# Allegro board SUB_DISPLAY_BOARD_V1_0.brd
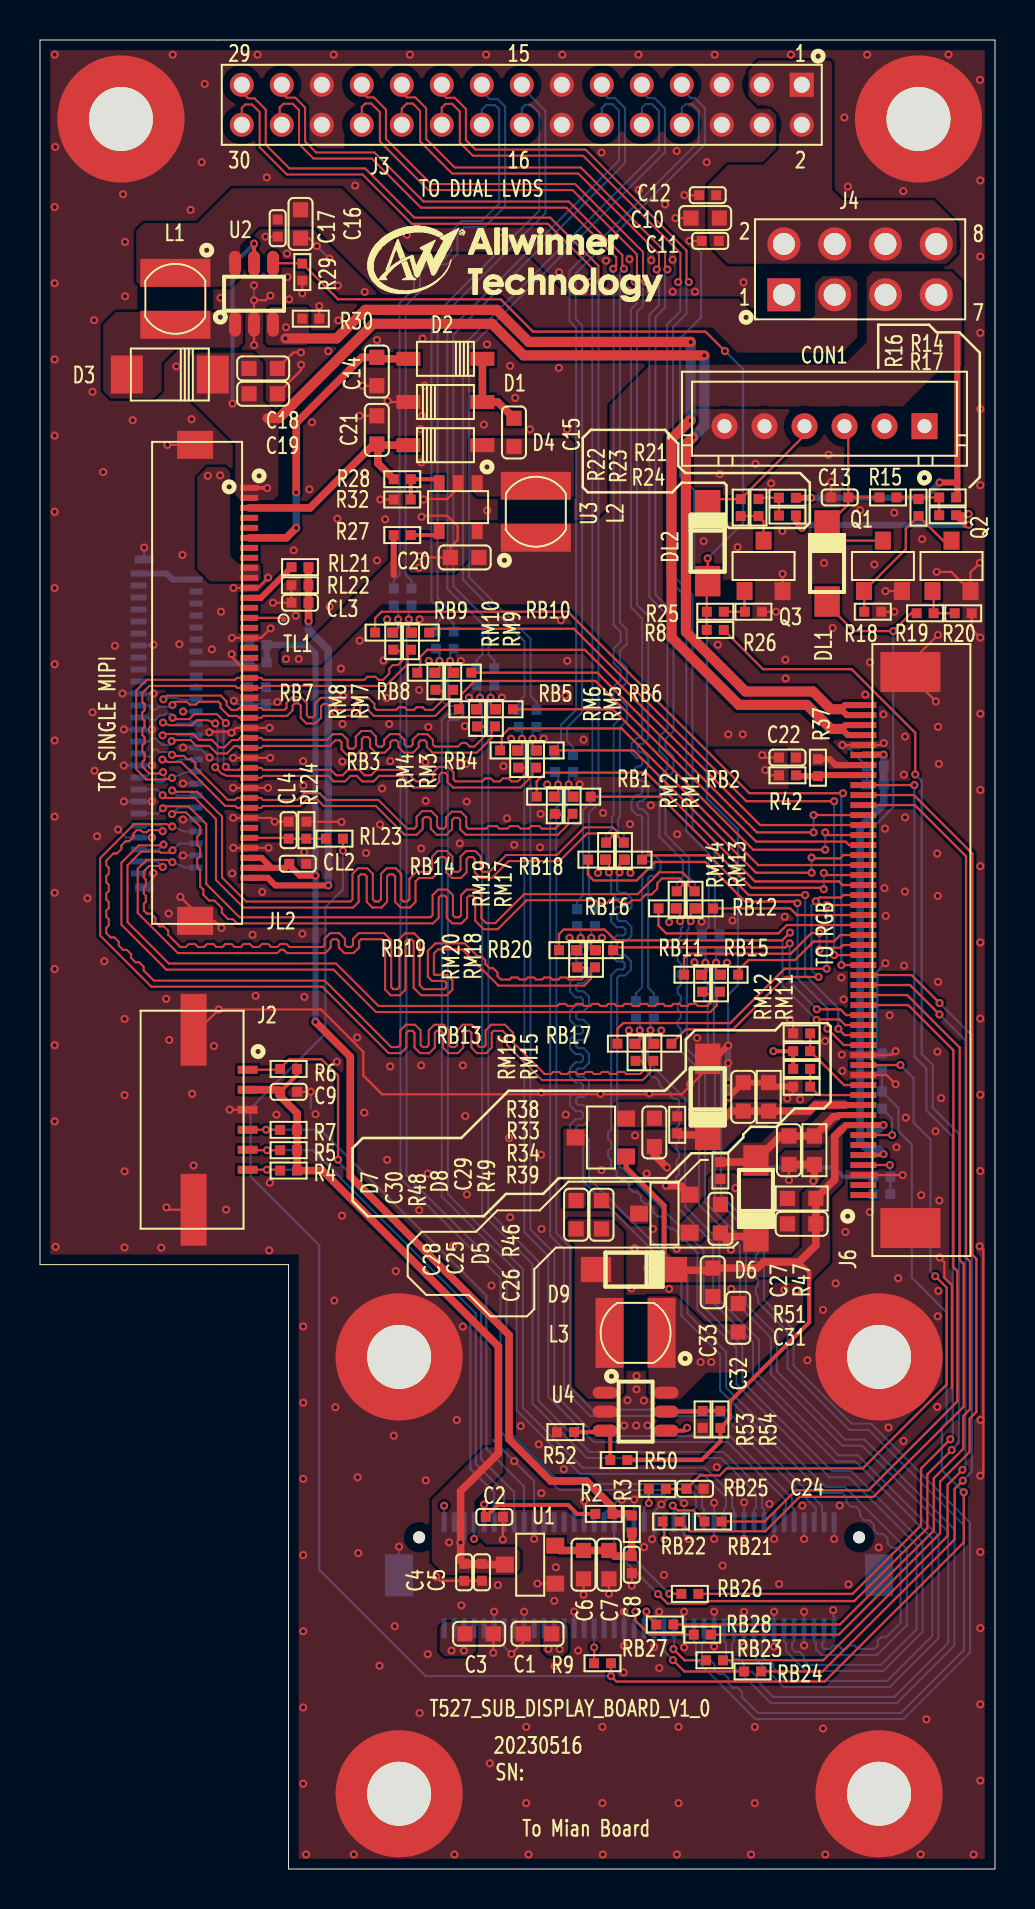
[diagram p0: board, top side]
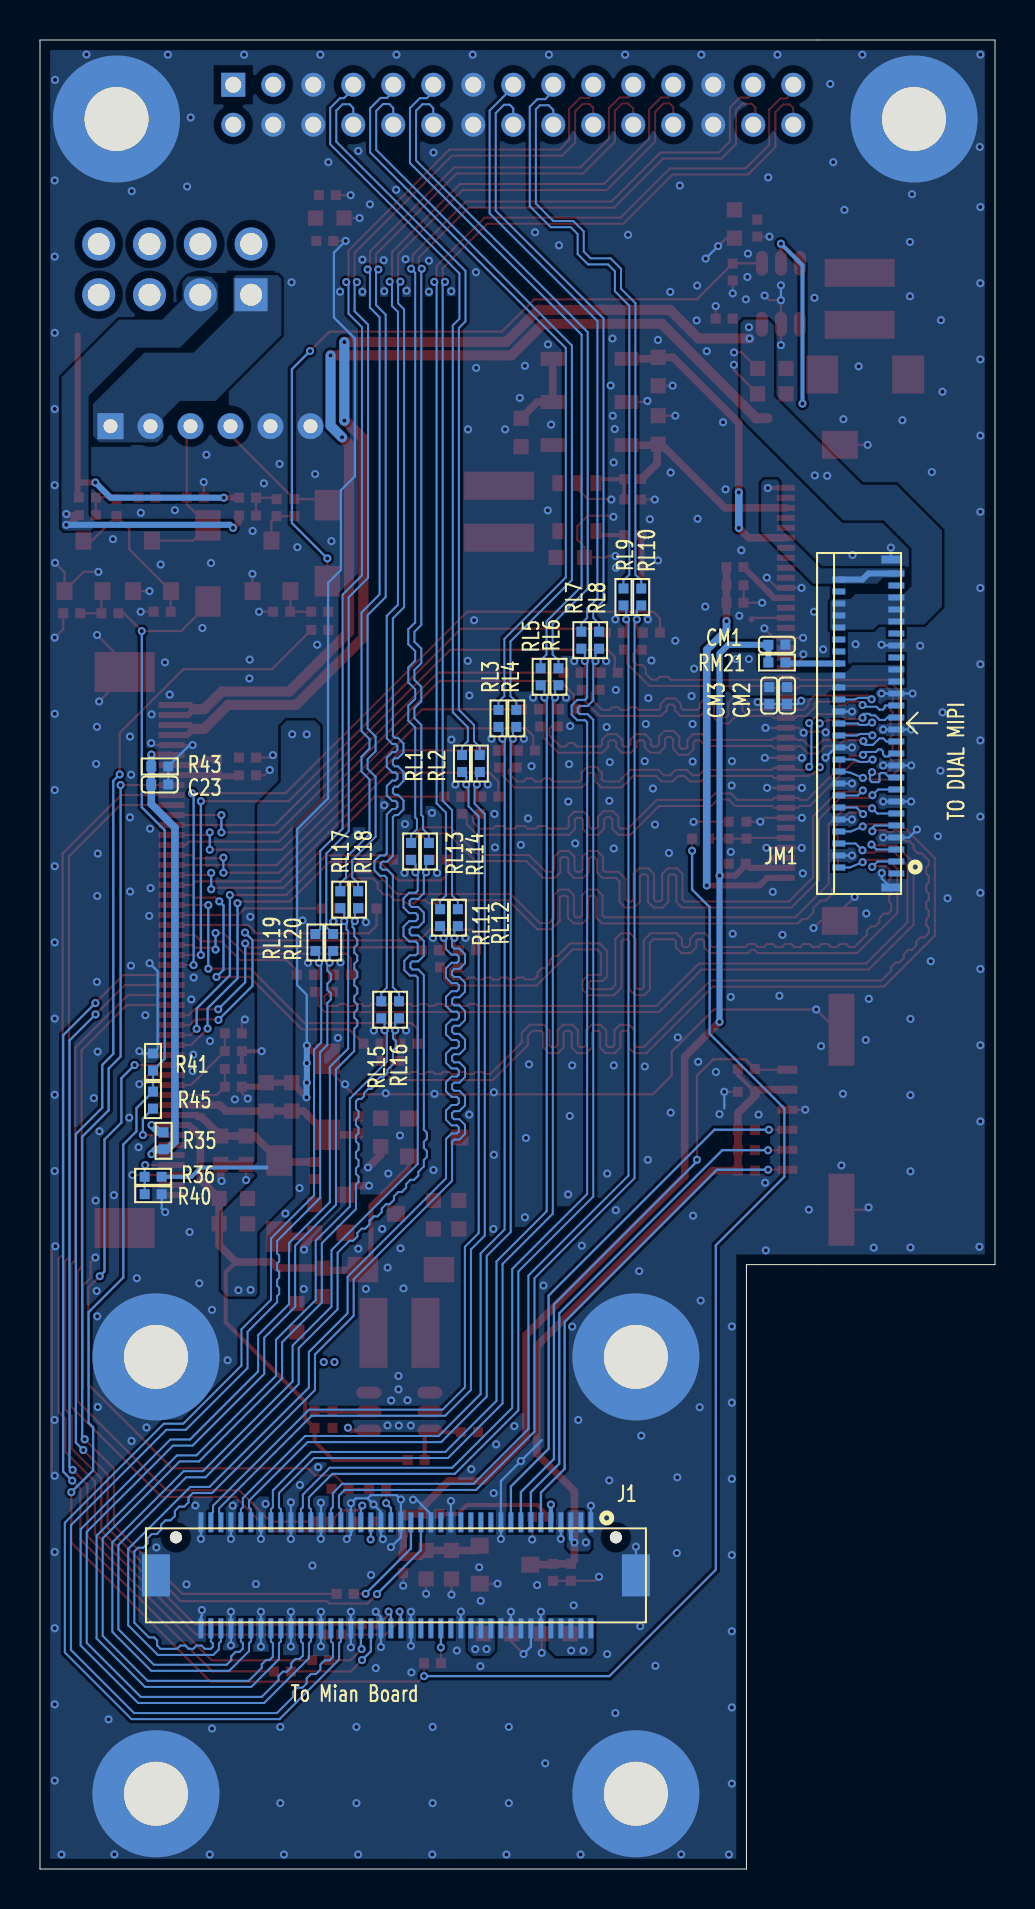
[diagram p1: board, bottom side, seen from below]

Outline 47.75 x 91.45 mm; copper layers: TOP, L2, L3, BOTTOM. Coordinates in mm from the lower left corner of the outline.
Outline path: 0,91.45 47.75,91.45 47.75,0 12.43,0 12.43,30.22 0,30.22 0,91.45

## Design rules (mm)
net group LCD-CLK: nets LCD0-CLK LCD-CLK
net group LCD-D20: nets LCD0-D20 LCD-D20
net group LCD-D21: nets LCD0-D21 LCD-D21
net group LCD-D22: nets LCD0-D22 LCD-D22
net group LCD-D23: nets LCD0-D23 LCD-D23
net group LCD-DE: nets LCD0-DE LCD-DE
net group LCD-HSYNC: nets LCD0-HSYNC LCD-HSYNC
net group LCD-VSYNC: nets LCD0-VSYNC LCD-VSYNC
net group DSI0-CKN: nets DSI0-CKN DSI0-CLKN LVDS0-DN2
net group DSI0-CKP: nets DSI0-CKP DSI0-CLKP LVDS0-DP2
net group DSI0-D0N: nets DSI0-D0N DSI0-DN0 LVDS0-DN0
net group DSI0-D0P: nets DSI0-D0P DSI0-DP0 LVDS0-DP0
net group DSI0-D1N: nets DSI0-D1N DSI0-DN1 LVDS0-DN1
net group DSI0-D1P: nets DSI0-D1P DSI0-DP1 LVDS0-DP1
net group DSI0-D2N: nets DSI0-D2N DSI0-DN2 LVDS0-CLKN
net group DSI0-D2P: nets DSI0-D2P DSI0-DP2 LVDS0-CLKP
net group DSI0-D3N: nets DSI0-D3N DSI0-DN3 LVDS0-DN3
net group DSI0-D3P: nets DSI0-D3P DSI0-DP3 LVDS0-DP3
net group DSI1-CKN: nets DSI1-CKN DSI1-CLKN LVDS1-DN2
net group DSI1-CKP: nets DSI1-CKP DSI1-CLKP LVDS1-DP2
net group DSI1-D0N: nets DSI1-D0N DSI1-DN0 LVDS1-DN0
net group DSI1-D0P: nets DSI1-D0P DSI1-DP0 LVDS1-DP0
net group DSI1-D1N: nets DSI1-D1N DSI1-DN1 LVDS1-DN1
net group DSI1-D1P: nets DSI1-D1P DSI1-DP1 LVDS1-DP1
net group DSI1-D2N: nets DSI1-D2N DSI1-DN2 LVDS1-CLKN
net group DSI1-D2P: nets DSI1-D2P DSI1-DP2 LVDS1-CLKP
net group DSI1-D3N: nets DSI1-D3N DSI1-DN3 LVDS1-DN3
net group DSI1-D3P: nets DSI1-D3P DSI1-DP3 LVDS1-DP3
net group LCD: nets LCD0-D0 LCD0-D1 LCD0-D2 LCD0-D3 LCD0-D4 LCD0-D5 LCD0-D6 LCD0-D7 LCD0-D8 LCD0-D9 LCD0-D10 LCD0-D11 LCD0-D12 LCD0-D13 LCD0-D14 LCD0-D15 LCD0-D16 LCD0-D17 LCD0-D18 LCD0-D19 LCD-BL-PWM LCD-BL-PWREN LCD-PWM LCD-PWREN LCD-RST
net group POWER: nets AVDD AVEE VCC-1V8 VCCIO-LCD1 VCL VCOM VCOM1

## Placement (name value [footprint] x y rotation side)
C1  22uF-10V  [C0603]  24.88 11.76 180 top
C2  100nF  [C0402]  22.72 17.6 0 top
C3  22uF-25V  [C0603]  21.96 11.76 0 top
C4  NC/10uF  [C0402]  21.21 14.84 90 top
C5  NC/100nF  [C0402]  22.1 14.84 90 top
C6  NC/22uF  [C0603]  27.18 15.22 90 top
C7  NC/22uF  [C0603]  28.45 15.22 90 top
C8  NC/100nF  [C0402]  29.59 15.22 90 top
C9  4.7uF  [C0402]  12.43 38.86 0 top
C10  10uF-25V  [C0603]  33.26 82.55 180 top
C11  100nF-50V  [C0402]  33.51 81.41 180 top
C12  100nF-50V  [C0402]  33.39 83.69 0 top
C13  1uF-16V  [C0402]  39.99 68.58 180 top
C14  10uF-10V  [C0603]  16.84 74.88 270 top
C15  10uF-10V  [C0603]  23.7 71.83 90 top
C16  10uF-10V  [C0603]  13.03 82.26 90 top
C17  1nF  [C0402]  11.88 82.04 90 top
C18  10uF-50V  [C0603]  11.16 75.03 180 top
C19  220nF-50V  [C0603]  11.16 73.76 180 top
C20  10uF  [C0603]  21.24 65.58 180 top
C21  10uF-10V  [C0603]  16.84 71.96 90 top
C22  10uF  [C0402]  37.37 55.58 0 top
C23  2.2uF  [C0402]  41.76 54.23 0 bottom
C24  NC  [C0402]  32.75 19.01 180 top
C25  220nF-50V  [C0603]  28.08 32.72 270 top
C26  220nF-50V  [C0603]  34.02 32.51 90 top
C27  220nF-50V  [C0603]  37.45 35.94 90 top
C28  220nF-50V  [C0603]  26.81 32.72 270 top
C29  220nF--50V  [C0603]  35.16 38.61 270 top
C30  220nF-50V  [C0603]  30.72 36.83 90 top
C31  220nF-50V  [C0603]  38.08 32.26 0 top
C32  10uF  [C0603]  34.91 27.56 270 top
C33  10uF-50V  [C0603]  33.64 29.34 90 top
CL2  10uF  [C0402]  12.89 50.26 0 top
CL3  1uF  [C0402]  13 63.31 180 top
CL4  NC/1uF  [C0402]  12.43 51.94 90 top
CM1  1uF  [C0402]  10.91 61.21 180 bottom
CM2  10uF  [C0402]  10.4 58.67 270 bottom
CM3  100nF  [C0402]  11.29 58.67 270 bottom
CON1  CON1X6-2.0-F-DIP  [SKT1_6P200B460_1400H610_V]  39.23 72.14 180 top
D1  XBS104S14  [SOD155_270H118]  20.27 73.35 180 top
D2  XBS104S14  [SOD155_270H118]  20.27 75.51 0 top
D3  SS16F  [SOD250_380H100]  6.49 74.73 0 top
D4  XBS104S14  [SOD155_270H118]  20.27 71.19 180 top
D5  BAT54S  [SOT-23]  31.23 32.77 180 top
D6  6.8V  [SOD170_285H135]  35.8 33.53 90 top
D7  BAT54S  [SOT-23]  28.05 36.58 180 top
D8  18V  [SOD170_285H135]  33.39 38.61 90 top
D9  XBS104S14  [SOD170_285H135]  29.7 29.97 180 top
DL1  NC/XBS104S14  [SOD170_285H135]  39.35 65.28 270 top
DL2  NC/XBS104S14  [SOD170_285H135]  33.39 66.29 270 top
H1  NC-HOLE  [MTH635D320]  17.96 25.61 0 top
H2  NC-HOLE  [MTH635D320]  41.96 3.76 0 top
H3  NC-HOLE  [MTH635D320]  43.93 87.5 0 top
H4  NC-HOLE  [MTH635D320]  4.05 87.5 0 top
H5  NC-HOLE  [MTH635D320]  41.96 25.61 0 top
H6  NC-HOLE  [MTH635D320]  17.96 3.76 0 top
J1  DF17(2.0)-80DP-0.5V  [SKT2_40P50B570_2500H350]  29.96 14.68 0 bottom
J2  CTP_CN  [FPC8P100B515_1090H340_B]  7.6 37.47 270 top
J3  DC3-2.0MM-30P  [HDR2_15P200B400_3000H200]  24.09 88.21 270 top
J4  CON2X4-2.54-M  [HDR2_4P254B500_1016H1160]  41.01 79.98 90 top
J6  CON50  [FPC52P50B490_3060H200_T]  44.07 45.95 90 top
JL2  FPC-40P-0.5MM-B  [FPC42P50B450_2410H150]  7.86 59.31 270 top
JM1  FH35C-51S-0.3SHW  [FPC51P30B335_1690H90_T]  6.37 57.28 90 bottom
L1  10uH  [LP300_350H210]  6.77 78.51 270 top
L2  10uH-0.9A-DCR<0.02R  [LP300_350H210]  24.79 67.87 90 top
L3  4.7uH  [LP300_350H210]  29.78 26.81 180 top
NOREF  -  []  12.43 0 90 top
NOREF#2  -  []  -131.29 -43.51 0 top
NOREF#3  -  []  0 90.72 0 top
NOREF#4  -  []  49.15 27.9 0 top
Q1  2N3904  [SOT-23]  42.15 65.15 90 top
Q2  2N3904  [SOT-23]  45.58 65.15 90 top
Q3  2N3904  [SOT-23]  36.18 65.15 90 top
R2  0R  [R0402]  28.19 17.76 0 top
R3  NC/0R  [R0402]  29.59 17.25 90 top
R4  NC/4K7  [R0402]  12.43 34.92 0 top
R5  NC/4K7  [R0402]  12.43 35.94 0 top
R6  NC/4K7  [R0402]  12.43 40.01 0 top
R7  NC/4K7  [R0402]  12.43 36.96 0 top
R8  0R  [R0402]  33.76 61.96 0 top
R9  0R  [R0402]  28.13 10.29 180 top
R14  NC/0R  [R0402]  45.38 68.58 0 top
R15  10K  [R0402]  42.4 68.58 0 top
R16  10K  [R0402]  43.93 68.07 90 top
R17  0R  [R0402]  45.38 67.69 0 top
R18  4.7K  [R0402]  41.64 62.87 180 top
R19  1K  [R0402]  44.26 62.79 180 top
R20  10K  [R0402]  46.16 62.79 180 top
R21  NC/0R  [R0402]  37.37 68.56 0 top
R22  1K  [R0402]  35.04 68.07 270 top
R23  1K  [R0402]  35.93 68.07 90 top
R24  0R  [R0402]  37.37 67.68 0 top
R25  1K  [R0402]  33.77 62.87 180 top
R26  10K  [R0402]  35.67 62.87 180 top
R27  10K  [R0402]  18.11 66.7 0 top
R28  9.1K-1%  [R0402]  18.11 69.49 0 top
R29  47K  [R0402]  13.12 79.85 90 top
R30  3R3-1%  [R0402]  13.54 77.52 180 top
R32  2.4K-1%  [R0402]  18.11 68.48 180 top
R33  NC/10K  [R0402]  38.08 40.89 0 top
R34  NC/10K  [R0402]  38.08 40.01 0 top
R35  3K-1%  [R0402]  41.57 36.41 270 bottom
R36  NC/10K  [R0402]  42.1 34.61 0 bottom
R37  10K  [R0402]  38.9 55.07 270 top
R38  10K  [R0402]  38.08 41.78 180 top
R39  10K  [R0402]  38.08 39.12 180 top
R40  10K  [R0402]  42.09 33.74 180 bottom
R41  1M  [R0402]  42.1 40.36 90 bottom
R42  NC/10K  [R0402]  37.37 54.69 180 top
R43  2.2K-1%  [R0402]  41.76 55.13 180 bottom
R45  10R  [R0402]  42.1 38.45 270 bottom
R46  1K5  [R0402]  34.02 34.92 90 top
R47  47K  [R0603]  38.72 35.94 270 top
R48  1K5  [R0402]  31.86 37.21 90 top
R49  47K  [R0603]  36.43 38.61 270 top
R50  71.5K-1%  [R0402]  28.94 20.45 0 top
R51  47K  [R0603]  38.08 33.53 0 top
R52  1.5K-1%  [R0402]  26.27 21.84 0 top
R53  NC  [R0402]  33.13 22.48 90 top
R54  0R  [R0402]  34.02 22.48 90 top
RB1  0R  [R0402]  25.26 53.62 0 top
RB2  0R  [R0402]  27.11 53.62 180 top
RB3  0R  [R0402]  23.43 55.93 0 top
RB4  0R  [R0402]  25.28 55.93 180 top
RB5  0R  [R0402]  21.37 57.99 0 top
RB6  0R  [R0402]  23.23 57.99 180 top
RB7  0R  [R0402]  19.29 59.82 0 top
RB8  0R  [R0402]  21.14 59.82 180 top
RB9  0R  [R0402]  17.18 61.82 0 top
RB10  0R  [R0402]  19.03 61.82 180 top
RB11  0R  [R0402]  32.63 44.72 0 top
RB12  0R  [R0402]  33.23 48.03 180 top
RB13  0R  [R0402]  29.3 41.27 0 top
RB14  0R  [R0402]  27.82 50.47 0 top
RB15  0R  [R0402]  34.48 44.72 180 top
RB16  0R  [R0402]  31.35 48.03 0 top
RB17  0R  [R0402]  31.15 41.27 180 top
RB18  0R  [R0402]  29.68 50.47 180 top
RB19  0R  [R0402]  26.37 45.94 0 top
RB20  0R  [R0402]  28.23 45.94 180 top
RB21  0R  [R0402]  33.65 17.37 180 top
RB22  0R  [R0402]  31.56 17.37 180 top
RB23  0R  [R0402]  33.72 10.44 180 top
RB24  0R  [R0402]  35.63 9.88 180 top
RB25  33R  [R0402]  30.87 19.01 180 top
RB26  0R  [R0402]  32.49 13.76 180 top
RB27  0R  [R0402]  31.24 12.23 180 top
RB28  0R  [R0402]  33.11 11.72 180 top
RL1  0R  [R0402]  26.65 55.28 270 bottom
RL2  0R  [R0402]  25.76 55.28 270 bottom
RL3  0R  [R0402]  24.83 57.53 270 bottom
RL4  0R  [R0402]  23.94 57.53 270 bottom
RL5  0R  [R0402]  22.72 59.61 270 bottom
RL6  0R  [R0402]  21.83 59.61 270 bottom
RL7  0R  [R0402]  20.69 61.44 270 bottom
RL8  0R  [R0402]  19.8 61.44 270 bottom
RL9  0R  [R0402]  18.58 63.6 270 bottom
RL10  0R  [R0402]  17.69 63.6 270 bottom
RL11  0R  [R0402]  27.75 47.57 270 bottom
RL12  0R  [R0402]  26.86 47.57 270 bottom
RL13  0R  [R0402]  29.19 50.88 270 bottom
RL14  0R  [R0402]  28.31 50.88 270 bottom
RL15  0R  [R0402]  30.69 42.96 270 bottom
RL16  0R  [R0402]  29.8 42.96 270 bottom
RL17  0R  [R0402]  32.74 48.47 270 bottom
RL18  0R  [R0402]  31.85 48.47 270 bottom
RL19  0R  [R0402]  33.98 46.33 270 bottom
RL20  0R  [R0402]  33.09 46.33 270 bottom
RL21  10K  [R0402]  13 65.1 0 top
RL22  10K  [R0402]  13 64.19 180 top
RL23  10K  [R0402]  14.72 51.52 180 top
RL24  12K  [R0402]  13.32 51.94 270 top
RM1  0R  [R0402]  26.63 53.19 90 top
RM2  0R  [R0402]  25.74 53.19 90 top
RM3  0R  [R0402]  24.8 55.5 90 top
RM4  0R  [R0402]  23.91 55.5 90 top
RM5  0R  [R0402]  22.74 57.56 90 top
RM6  0R  [R0402]  21.85 57.56 90 top
RM7  0R  [R0402]  20.66 59.39 90 top
RM8  0R  [R0402]  19.77 59.39 90 top
RM9  0R  [R0402]  18.55 61.39 90 top
RM10  0R  [R0402]  17.66 61.39 90 top
RM11  0R  [R0402]  34 44.28 90 top
RM12  0R  [R0402]  33.11 44.28 90 top
RM13  0R  [R0402]  32.72 48.46 270 top
RM14  0R  [R0402]  31.84 48.46 270 top
RM15  0R  [R0402]  30.67 40.84 90 top
RM16  0R  [R0402]  29.78 40.84 90 top
RM17  0R  [R0402]  29.19 50.9 270 top
RM18  0R  [R0402]  27.75 45.51 90 top
RM19  0R  [R0402]  28.31 50.9 270 top
RM20  0R  [R0402]  26.86 45.51 90 top
RM21  NC/0R  [R0402]  10.91 60.33 0 bottom
TL1  PWM  [TP30]  12.18 62.48 0 top
U1  NC/XC6206P182MR  [SOT-23]  24.51 15.22 180 top
U2  AP3032KTR-G1  [SOT23-6]  10.7 78.77 0 top
U3  SP4446  [SOT5P95B160_300H130]  20.91 68.09 270 top
U4  AP3031KTR-G1  [SOT23-6]  29.78 22.87 270 top

## Library data of the parts
C1-C3 C13 = CAPACITOR_0: room: LVDS
C4-C8 C22 CM1-CM3 = C-C0402
C9 = C-C0402: room: EMMC
C10 = C-C0603
C11 C12 = C-C0805
C14 C15 C20 C21 = C-C0603-X5R
C16-C19 C23 C24 C26-C33 = CAPACITOR_0
C25 = CAPACITOR_1
CL2-CL4 = C-C0402-X5R: room: EMMC
CON1 = CON1X6-2.54-F-DIP
D1 D2 D4 = DIO-XBS104S14
D3 D9 = DIODE SCHOTTKY
D5 D7 = DIODE_DUAL
D6 D8 = DIODE ZENER_0
DL1 DL2 = DIODE_SCHOTTKY_0
H1-H6 = HOLE
J1 = DF17-3.0-80DS-0.5V
J2 = CTP_CN_2
J3 = DC3-2_0.0MM-30P
J4 = CON2X4-2.54-M
J6 = AT070TN93_0
JL2 = FPC-40P-0_0.5MM-B
JM1 = FH35C-51S-0_0.3SHW
L1 L3 = INDUCTOR
L2 = L-L2520
Q1-Q3 = NPN-MMBT3904_0
R2 R3 R27 RL21 RL22 = R-R0603-5%
R4-R7 RM21 = R-R0402-5%
R8 R9 R14-R26 RB1-RB20 = R-R0603
R28 R32 RL23 RL24 = R-R0402-5%: room: EMMC
R29 R30 R33-R43 R45-R54 = RESISTOR
RB21-RB24 RB26-RB28 RL1-RL20 RM1-RM20 = R-R0603: signal model: R-R0603_R0402_0R_0R
RB25 = R-R0603: signal model: R-R0603_R0402_33R_33R
TL1 = TestPoint-on wire
U1 = TPS7B6933QDCYRQ1_0
U2 = AP3031: Tolerance: RichardLC
U3 = SP4446
U4 = AP3019: Tolerance: RichardLC

## Footprints (pads in the part's own frame, mm; a bottom-side part is the same pattern mirrored in y, then rotated)
C0402
  rect 0.5x0.5 smd: 1(-0.425,0) 2(0.425,0)
C0603
  rect 0.76x0.76 smd: 1(-0.71,0) 2(0.71,0)
FPC8P100B515_1090H340_B
  rect 0.4x1 smd: 1(-2.5,2.775) 2(-1.5,2.775) 3(-0.5,2.775) 4(0.5,2.775) 5(1.5,2.775) 6(2.5,2.775)
  rect 3.6x1.3 smd: 7(4.5,0.075) 8(-4.5,0.075)
FPC42P50B450_2410H150
  rect 0.3x0.9 smd: 1(-9.75,2.6) 2(-9.25,2.6) 3(-8.75,2.6) 4(-8.25,2.6) 5(-7.75,2.6) 6(-7.25,2.6) 7(-6.75,2.6) 8(-6.25,2.6) 9(-5.75,2.6) 10(-5.25,2.6) 11(-4.75,2.6) 12(-4.25,2.6) 13(-3.75,2.6) 14(-3.25,2.6) 15(-2.75,2.6) 16(-2.25,2.6) 17(-1.75,2.6) 18(-1.25,2.6) 19(-0.75,2.6) 20(-0.25,2.6) 21(0.25,2.6) 22(0.75,2.6) 23(1.25,2.6) 24(1.75,2.6) 25(2.25,2.6) 26(2.75,2.6) 27(3.25,2.6) 28(3.75,2.6) 29(4.25,2.6) 30(4.75,2.6) 31(5.25,2.6) 32(5.75,2.6) 33(6.25,2.6) 34(6.75,2.6) 35(7.25,2.6) 36(7.75,2.6) 37(8.25,2.6) 38(8.75,2.6) 39(9.25,2.6) 40(9.75,2.6)
  rect 1.4x1.8 smd: 41(11.9,-0.1) 42(-11.9,-0.1)
FPC51P30B335_1690H90_T
  rect 0.3x0.8 smd: 1(-7.5,-1.437) 3(-6.9,-1.437) 5(-6.3,-1.437) 7(-5.7,-1.437) 9(-5.1,-1.437) 11(-4.5,-1.437) 13(-3.9,-1.437) 15(-3.3,-1.437) 17(-2.7,-1.437) 19(-2.1,-1.437) 21(-1.5,-1.437) 23(-0.9,-1.437) 25(-0.3,-1.437) 27(0.3,-1.437) 29(0.9,-1.437) 31(1.5,-1.437) 33(2.1,-1.437) 35(2.7,-1.437) 37(3.3,-1.437) 39(3.9,-1.437) 41(4.5,-1.437) 43(5.1,-1.437) 45(5.7,-1.437) 47(6.3,-1.437) 49(6.9,-1.437) 51(7.5,-1.437)
  rect 0.3x0.65 smd: 2(-7.2,1.437) 4(-6.6,1.437) 6(-6,1.437) 8(-5.4,1.437) 10(-4.8,1.437) 12(-4.2,1.437) 14(-3.6,1.437) 16(-3,1.437) 18(-2.4,1.437) 20(-1.8,1.437) 22(-1.2,1.437) 24(-0.6,1.437) 26(0,1.437) 28(0.6,1.437) 30(1.2,1.437) 32(1.8,1.437) 34(2.4,1.437) 36(3,1.437) 38(3.6,1.437) 40(4.2,1.437) 42(4.8,1.437) 44(5.4,1.437) 46(6,1.437) 48(6.6,1.437) 50(7.2,1.437)
  rect 0.4x0.95 smd: 52(-8.2,-1.163) 53(8.2,-1.163)
FPC52P50B490_3060H200_T
  rect 0.3x1.3 smd: 1(-12.25,2.9) 2(-11.75,2.9) 3(-11.25,2.9) 4(-10.75,2.9) 5(-10.25,2.9) 6(-9.75,2.9) 7(-9.25,2.9) 8(-8.75,2.9) 9(-8.25,2.9) 10(-7.75,2.9) 11(-7.25,2.9) 12(-6.75,2.9) 13(-6.25,2.9) 14(-5.75,2.9) 15(-5.25,2.9) 16(-4.75,2.9) 17(-4.25,2.9) 18(-3.75,2.9) 19(-3.25,2.9) 20(-2.75,2.9) 21(-2.25,2.9) 22(-1.75,2.9) 23(-1.25,2.9) 24(-0.75,2.9) 25(-0.25,2.9) 26(0.25,2.9) 27(0.75,2.9) 28(1.25,2.9) 29(1.75,2.9) 30(2.25,2.9) 31(2.75,2.9) 32(3.25,2.9) 33(3.75,2.9) 34(4.25,2.9) 35(4.75,2.9) 36(5.25,2.9) 37(5.75,2.9) 38(6.25,2.9) 39(6.75,2.9) 40(7.25,2.9) 41(7.75,2.9) 42(8.25,2.9) 43(8.75,2.9) 44(9.25,2.9) 45(9.75,2.9) 46(10.25,2.9) 47(10.75,2.9) 48(11.25,2.9) 49(11.75,2.9) 50(12.25,2.9)
  rect 2x3 smd: 51(13.9,0.55) 52(-13.9,0.55)
HDR2_4P254B500_1016H1160
  rect 1.65x1.65 hole 1.1: 1(-1.27,3.81)
  round 1.65 hole 1.1: 2(1.27,3.81) 3(-1.27,1.27) 4(1.27,1.27) 5(-1.27,-1.27) 6(1.27,-1.27) 7(-1.27,-3.81) 8(1.27,-3.81)
HDR2_15P200B400_3000H200
  rect 1.2x1.2 hole 0.8: 1(-1,14)
  round 1.2 hole 0.8: 2(1,14) 3(-1,12) 4(1,12) 5(-1,10) 6(1,10) 7(-1,8) 8(1,8) 9(-1,6) 10(1,6) 11(-1,4) 12(1,4) 13(-1,2) 14(1,2) 15(-1,0) 16(1,0) 17(-1,-2) 18(1,-2) 19(-1,-4) 20(1,-4) 21(-1,-6) 22(1,-6) 23(-1,-8) 24(1,-8) 25(-1,-10) 26(1,-10) 27(-1,-12) 28(1,-12) 29(-1,-14) 30(1,-14)
LP300_350H210
  rect 1.4x3.5 smd: 1(-1.3,0) 2(1.3,0)
MTH635D320
  round 6.35 hole 3.2: 1(0,0)
R0402
  rect 0.5x0.5 smd: 1(-0.425,0) 2(0.425,0)
R0603
  rect 0.76x0.76 smd: 1(-0.71,0) 2(0.71,0)
SKT1_6P200B460_1400H610_V
  rect 1.3x1.3 hole 0.7: 1(-5,0)
  round 1.3 hole 0.7: 2(-3,0) 3(-1,0) 4(1,0) 5(3,0) 6(5,0)
SKT2_40P50B570_2500H350
  round 0.6 hole 0.6 unplated: (-11,-1.9) (11,-1.9)
  rect 0.25x1 smd: 1(-9.75,-2.65) 2(-9.75,2.65) 3(-9.25,-2.65) 4(-9.25,2.65) 5(-8.75,-2.65) 6(-8.75,2.65) 7(-8.25,-2.65) 8(-8.25,2.65) 9(-7.75,-2.65) 10(-7.75,2.65) 11(-7.25,-2.65) 12(-7.25,2.65) 13(-6.75,-2.65) 14(-6.75,2.65) 15(-6.25,-2.65) 16(-6.25,2.65) 17(-5.75,-2.65) 18(-5.75,2.65) 19(-5.25,-2.65) 20(-5.25,2.65) 21(-4.75,-2.65) 22(-4.75,2.65) 23(-4.25,-2.65) 24(-4.25,2.65) 25(-3.75,-2.65) 26(-3.75,2.65) 27(-3.25,-2.65) 28(-3.25,2.65) 29(-2.75,-2.65) 30(-2.75,2.65) 31(-2.25,-2.65) 32(-2.25,2.65) 33(-1.75,-2.65) 34(-1.75,2.65) 35(-1.25,-2.65) 36(-1.25,2.65) 37(-0.75,-2.65) 38(-0.75,2.65) 39(-0.25,-2.65) 40(-0.25,2.65) 41(0.25,-2.65) 42(0.25,2.65) 43(0.75,-2.65) 44(0.75,2.65) 45(1.25,-2.65) 46(1.25,2.65) 47(1.75,-2.65) 48(1.75,2.65) 49(2.25,-2.65) 50(2.25,2.65) 51(2.75,-2.65) 52(2.75,2.65) 53(3.25,-2.65) 54(3.25,2.65) 55(3.75,-2.65) 56(3.75,2.65) 57(4.25,-2.65) 58(4.25,2.65) 59(4.75,-2.65) 60(4.75,2.65) 61(5.25,-2.65) 62(5.25,2.65) 63(5.75,-2.65) 64(5.75,2.65) 65(6.25,-2.65) 66(6.25,2.65) 67(6.75,-2.65) 68(6.75,2.65) 69(7.25,-2.65) 70(7.25,2.65) 71(7.75,-2.65) 72(7.75,2.65) 73(8.25,-2.65) 74(8.25,2.65) 75(8.75,-2.65) 76(8.75,2.65) 77(9.25,-2.65) 78(9.25,2.65) 79(9.75,-2.65) 80(9.75,2.65)
  rect 1.4x2.1 smd: 81(12,0) 82(-12,0)
SOD155_270H118
  rect 1.2x0.7 smd: 1(-1.85,0) 2(1.85,0)
SOD170_285H135
  rect 1.524x1.27 smd: 1(1.9,0) 2(-1.9,0)
SOD250_380H100
  rect 1.6x1.9 smd: 1(-2.15,0) 2(2.15,0)
SOT5P95B160_300H130
  rect 0.8x0.55 smd: 1(-1.2,0.95) 2(-1.2,0) 3(-1.2,-0.95) 4(1.2,-0.95) 5(1.2,0.95)
SOT23-6
  oval 0.6x1.25 smd: 1(-0.95,-1.525) 2(0,-1.525) 3(0.95,-1.525) 4(0.95,1.525) 5(0,1.525) 6(-0.95,1.525)
SOT-23
  rect 0.9x0.8 smd: 1(-1.254,0.95) 2(-1.254,-0.95) 3(1.27,0)
TP30
  round 0.3 smd: 1(0,0)

## Nets
AVDD: C21.1 D4.2 JL2.3(VLED0) R28.1
AVDD-LCD: C31.2 C33.2 D7.1 D9.2 J6.8(AVDD) R35.1 R50.2 R51.2 R54.1
AVEE: C14.1 D2.1 JL2.6(NC12)
GND: C1.2 C2.2 C3.2 C4.1 C5.1 C6.1 C7.1 C8.1 C9.2 C10.2 C11.2 C12.1 C13.2 C14.2 C16.1 C17.1 C18.1 C19.1 C20.2 C21.2 C22.1 C23.1 C24.1 C26.1 C27.1 C29.1 C30.1 C31.1 C32.1 C33.1 CL2.2 CL3.2 CL4.2 CM1.2 CM2.2 CM3.2 CON1.5 CON1.6 D1.2 D5.2 D6.2(CATHODE) D8.1(ANODE) H1.1 H2.1 H3.1 H4.1 H5.1 H6.1 J1.1(P1) J1.7(P7) J1.12(P12) J1.14(P14) J1.16(P16) J1.18(P18) J1.19(P19) J1.20(P20) J1.28(P28) J1.29(P29) J1.33(P33) J1.38(P38) J1.39(P39) J1.43(P43) J1.44(P44) J1.49(P49) J1.50(P50) J1.55(P55) J1.56(P56) J1.61(P61) J1.62(P62) J1.67(P67) J1.68(P68) J1.73(P73) J1.74(P74) J1.79(P79) J1.80(P80) J1.81(GND0) J1.82(GND1) J2.3(GND) J2.7(GND0) J2.8(GND1) J3.4(GND1) J3.5(GND2) J3.6(GND3) J3.13(GND4) J3.14(GND5) J3.25(GND6) J3.26(GND7) J6.3(GND3) J6.13(GND2) J6.15(GND1) J6.46(GND0) J6.51(GND4) J6.52(GND5) JL2.11(NC10) JL2.16(GND3) JL2.19(GND2) JL2.22(GND1) JL2.25(VSS2) JL2.28(VSS1) JL2.31(VSS0) JL2.34(DATAEDID) JL2.37(VDDEDID) JL2.41(NC14) JL2.42(NC15) JM1.4(GND0) JM1.7(GND1) JM1.10(GND2) JM1.13(GND3) JM1.16(GND4) JM1.19(GND5) JM1.22(GND6) JM1.25(GND7) JM1.28(GND8) JM1.31(GND9) JM1.39(GND10) JM1.52(NC2) JM1.53(NC3) Q1.2(E) Q2.2(E) Q3.2(E) R18.1 R20.1 R26.1 R29.1 R30.1 R32.2 R38.2 R39.2 R40.2 R41.2 R42.2 R43.2 R47.2 R49.1 R51.1 R52.1 R53.1 RL22.2 RL24.1 U1.1(GND) U2.2(GND) U3.2(GND) U4.2(GND)
VCC-1V8: CL2.1 CM1.1 JL2.38(VDD1) JL2.39(VDD0) R2.2 R3.2 RM21.2
VCC-3V3-DEV: C4.2 C5.2 C9.1 C20.1 C22.2 C32.2 CM2.1 CM3.1 J1.3(P3) J1.5(P5) J2.2(VCC) J4.5 J4.7 J6.44(DVDD) JM1.32(LCD_VCC0) JM1.33(LCD_VCC1) JM1.34(LCD_VCC2) JM1.35(LCD_VCC3) L2.1 L3.1 R4.2 R5.2 R6.2 R7.2 R14.2 R21.2 R27.1 R33.1 R34.1 R36.1 R37.1 U1.3(VIN) U3.5(VIN) U4.4(EN) U4.6(VDD)
VCC-5V: C1.1 C16.2 C17.2 J1.22(P22) J1.24(P24) J1.26(P26) J4.3 L1.1 R17.2 R24.2 U2.6(VDD)
VCC-PANEL: C10.1 C11.1 C12.2 J3.1(VCC1) J3.2(VCC2) J3.3(VCC3) J4.2 J4.4 J4.6 J4.8
VCCIO-LCD1: C2.1 J1.9(P9) R2.1
CTP-INT: J1.17(P17) J2.4(INT) R7.1
CTP-RST: J1.15(P15) J2.1(RST) R6.1
CTP-SCK: J1.11(P11) J2.6(SCL) R4.1
CTP-SDA: J1.13(P13) J2.5(SDA) R5.1
DCIN-12V: C3.1 CON1.1 CON1.2 J1.2(P2) J1.4(P4) J1.6(P6) J1.8(P8) J1.10(P10) J4.1
DITHB: J6.4(DITHB) R36.2 R40.1
DSI0-CKN: J1.65(P65) RB6.2 RL5.2 RM5.2
DSI0-CKP: J1.63(P63) RB5.2 RL6.2 RM6.2
DSI0-CLKN: JL2.27(RXIN2N) JM1.23(MDIF1_CLKN) RM5.1
DSI0-CLKP: JL2.26(RXIN2P) JM1.24(MDIF1_CLKP) RM6.1
DSI0-D0N: J1.77(P77) RB2.2 RL1.2 RM1.2
DSI0-D0P: J1.75(P75) RB1.2 RL2.2 RM2.2
DSI0-D1N: J1.71(P71) RB4.2 RL3.2 RM3.2
DSI0-D1P: J1.69(P69) RB3.2 RL4.2 RM4.2
DSI0-D2N: J1.59(P59) RB8.2 RL7.2 RM7.2
DSI0-D2P: J1.57(P57) RB7.2 RL8.2 RM8.2
DSI0-D3N: J1.53(P53) RB10.2 RL9.2 RM9.2
DSI0-D3P: J1.51(P51) RB9.2 RL10.2 RM10.2
DSI0-DN0: JL2.33(RXIN0N) JM1.20(MDIF1_0N) RM1.1
DSI0-DN1: JL2.30(RXIN1N) JM1.26(MDIF1_1N) RM3.1
DSI0-DN2: JL2.24(CLK1INN) JM1.29(MDIF1_2N) RM7.1
DSI0-DN3: JL2.21(NC2) JM1.17(MDIF1_3N) RM9.1
DSI0-DP0: JL2.32(RXIN0P) JM1.21(MDIF1_0P) RM2.1
DSI0-DP1: JL2.29(RXIN1P) JM1.27(MDIF1_1P) RM4.1
DSI0-DP2: JL2.23(CLK1INP) JM1.30(MDIF1_2P) RM8.1
DSI0-DP3: JL2.20(NC3) JM1.18(MDIF1_3P) RM10.1
DSI1-CKN: J1.64(P64) RB17.2 RL15.2 RM15.2
DSI1-CKP: J1.66(P66) RB13.2 RL16.2 RM16.2
DSI1-CLKN: JM1.8(MDIF2_CLKN) RM15.1
DSI1-CLKP: JM1.9(MDIF2_CLKP) RM16.1
DSI1-D0N: J1.52(P52) RB15.2 RL19.2 RM11.2
DSI1-D0P: J1.54(P54) RB11.2 RL20.2 RM12.2
DSI1-D1N: J1.58(P58) RB12.2 RL17.2 RM13.2
DSI1-D1P: J1.60(P60) RB16.2 RL18.2 RM14.2
DSI1-D2N: J1.70(P70) RB18.2 RL13.2 RM17.2
DSI1-D2P: J1.72(P72) RB14.2 RL14.2 RM19.2
DSI1-D3N: J1.76(P76) RB20.2 RL11.2 RM18.2
DSI1-D3P: J1.78(P78) RB19.2 RL12.2 RM20.2
DSI1-DN0: JM1.5(MDIF2_0N) RM11.1
DSI1-DN1: JM1.11(MDIF2_1N) RM13.1
DSI1-DN2: JM1.14(MDIF2_2N) RM17.1
DSI1-DN3: JM1.2(MDIF2_3N) RM18.1
DSI1-DP0: JM1.6(MDIF2_0P) RM12.1
DSI1-DP1: JM1.12(MDIF2_1P) RM14.1
DSI1-DP2: JM1.15(MDIF2_2P) RM19.1
DSI1-DP3: JM1.3(MDIF2_3P) RM20.1
L/R: J6.12(L/R) R33.2 R38.1
LCD0-CLK: C24.2 J6.14(DCLK) RB25.1
LCD0-D0: J6.32(B0) RB1.1
LCD0-D1: J6.33(B1) RB2.1
LCD0-D2: J6.34(B2) RB3.1
LCD0-D3: J6.35(B3) RB4.1
LCD0-D4: J6.36(B4) RB5.1
LCD0-D5: J6.37(B5) RB6.1
LCD0-D6: J6.38(B6) RB7.1
LCD0-D7: J6.39(B7) RB8.1
LCD0-D8: J6.24(G0) RB9.1
LCD0-D9: J6.25(G1) RB10.1
LCD0-D10: J6.26(G2) RB11.1
LCD0-D11: J6.27(G3) RB15.1
LCD0-D12: J6.28(G4) RB16.1
LCD0-D13: J6.29(G5) RB12.1
LCD0-D14: J6.30(G6) RB13.1
LCD0-D15: J6.31(G7) RB17.1
LCD0-D16: J6.16(R0) RB14.1
LCD0-D17: J6.17(R1) RB18.1
LCD0-D18: J6.18(R2) RB19.1
LCD0-D19: J6.19(R3) RB20.1
LCD0-D20: J6.20(R4) RB21.1
LCD0-D21: J6.21(R5) RB22.1
LCD0-D22: J6.22(R6) RB23.1
LCD0-D23: J6.23(R7) RB24.1
LCD0-DE: J6.42(DE) RB26.1
LCD0-HSYNC: J6.40(HS) RB27.1
LCD0-VSYNC: J6.41(VS) RB28.1
LCD-BL-PWM: J1.35(P35) R8.2
LCD-BL-PWREN: J1.32(P32) R9.2
LCD-CLK: J1.41(P41) RB25.2
LCD-D20: J1.47(P47) RB21.2
LCD-D21: J1.45(P45) RB22.2
LCD-D22: J1.48(P48) RB23.2
LCD-D23: J1.46(P46) RB24.2
LCD-DE: J1.37(P37) RB26.2
LCD-HSYNC: J1.42(P42) RB27.2
LCD-PWM: DL2.1 R8.1 R25.2 R29.2 U2.4(EN)
LCD-PWREN: DL1.1 R9.1 R19.2 R41.1 R45.1 RL23.1
LCD-RST: J6.7(RESET) R45.2
LCD-VSYNC: J1.40(P40) RB28.2
LVDS0-CLKN: J3.15(0-VNC) RL7.1
LVDS0-CLKP: J3.16(0-VPC) RL8.1
LVDS0-DN0: J3.7(0-VN0) RL1.1
LVDS0-DN1: J3.9(0-VN1) RL3.1
LVDS0-DN2: J3.11(0-VN2) RL5.1
LVDS0-DN3: J3.17(0-VN3) RL9.1
LVDS0-DP0: J3.8(0-VP0) RL2.1
LVDS0-DP1: J3.10(0-VP1) RL4.1
LVDS0-DP2: J3.12(0-VP2) RL6.1
LVDS0-DP3: J3.18(0-VP3) RL10.1
LVDS1-CLKN: J3.27(1-VNC) RL13.1
LVDS1-CLKP: J3.28(1-VPC) RL14.1
LVDS1-DN0: J3.19(1-VN0) RL19.1
LVDS1-DN1: J3.21(1-VN1) RL17.1
LVDS1-DN2: J3.23(1-VN2) RL15.1
LVDS1-DN3: J3.29(1-VN3) RL11.1
LVDS1-DP0: J3.20(1-VP0) RL20.1
LVDS1-DP1: J3.22(1-VP1) RL18.1
LVDS1-DP2: J3.24(1-VP2) RL16.1
LVDS1-DP3: J3.30(1-VP3) RL12.1
MODE: J6.43(MODE) R37.2 R42.1
PWM: JL2.14(NC7) TL1.1(TP)
RST: CL4.1 JL2.36(NC1) RL23.2 RL24.2
U/D: J6.11(U/D) R34.2 R39.1
VCL: JL2.12(NC9) RL21.1
VCOM: CL3.1 JL2.40(NC0) RL21.2 RL22.1
VCOM1: C23.2 J6.5(VCOM1) J6.45(VCOM0) R35.2 R43.1
VGH-LCD: C29.2 D8.2(CATHODE) J6.10(VGH) R48.1 R49.2
VGL-LCD: C27.2 D6.1(ANODE) J6.9(VGL) R46.2 R47.1
VLED+: C18.2 C19.2 D3.2 J6.49(VLED1+) J6.50(VLED0+) JL2.1(VLED2) JL2.2(VLED1) JM1.50(VLED0) JM1.51(VLED1) U2.5(OVR)
VLED-: J6.47(VLED1-) J6.48(VLED0-) JL2.9(VFB2) JL2.10(VFB1) JM1.42(LED_6) JM1.43(LED_5) JM1.44(LED_4) JM1.45(LED_3) JM1.46(LED_2) JM1.47(LED_1) R30.2 U2.3(FB)
N16786142: JM1.36(ID&WP) RM21.1
N16885607: C6.2 C7.2 C8.2 R3.1 U1.2(VOUT)
N16920620: CON1.4 DL2.2 R22.1
N16920652: R14.1 R15.2 R16.2 R17.1
N16920687: C13.1 CON1.3 DL1.2 Q1.3(C) R15.1
N16920734: Q1.1(B) Q2.3(C) R16.1 R18.2
N16920761: Q2.1(B) R19.1 R20.2
N16920797: R21.1 R23.2 R24.1
N16920814: Q3.3(C) R22.2 R23.1
N16920890: Q3.1(B) R25.1 R26.2
N16934978: C15.2 D1.1 D2.2
N16934980: C15.1 D4.1 L2.2 U3.1(SW)
N16935012: R28.2 R32.1 U3.3(FB)
N16935078: R27.2 U3.4(SHDN#)
N16938533: D3.1 L1.2 U2.1(LX)
N17008403: C25.2 C28.2 D9.1 L3.2 U4.1(LX)
N17008410: R50.1 R52.2 U4.3(FB)
N17008549: C28.1 D7.3
N17008582: C30.2 D7.2 R48.2
N17008674: C26.2 D5.1 R46.1
N17008714: C25.1 D5.3
N17046759: R53.2 R54.2 U4.5(OVR)

Pads without a net: J1 21 23 25 27 30 31 34 36; J6 1 2 6; JL2 4 5 7 8 13 15 17 18 35; JM1 1 37 38 40 41 48 49

## Via types
v1: diameter 0.406, hole 0.203, TOP to BOTTOM, 669 vias

## Routing (per net, layer and track width the routed paths; a pad name or vN(x,y) marks a point on that pad's centre or on a via; arc(x,y) is an arc through that point)
AVDD: length 11.3
  TOP w0.381: JL2.3 13.5,68.06 16.69,71.25 C21.1 16.89,71.19 ; R28.1 16.89,70.28 16.89,71.19 ; 16.89,71.19 D4.2
AVDD-LCD: length 39.7
  TOP w0.203: 37.96,30.35 38.47,29.84 38.47,27.34 34.49,23.36 34.49,22.52 R54.1 34.02,21.38 33.09,20.45 R50.2
  TOP w0.254: D7.1 29.31,35.07 31.21,33.17 31.21,30.37 D9.2
  TOP w0.305: 40.09,36.99 40.3,37.2 J6.8 v1(42.17,37.2)
  TOP w0.381: 40.09,36.99 39.74,36.63 39.74,34.47 R51.2 C31.2 38.79,31.19 37.96,30.35 36.18,30.35 35.87,30.05 C33.2 33.53,29.94 31.64,29.94 D9.2
  BOTTOM w0.381: v1(42.17,37.2) 41.81,36.84 R35.1
AVEE: length 14.8
  TOP w0.381: D2.1 16.92,75.51 C14.1 16.09,75.59 12.81,72.3 v1(12.81,68.83) ; JL2.6 12.31,66.56 v1(12.81,67.06)
  BOTTOM w0.381: v1(12.81,67.06) v1(12.81,68.83)
GND: length 261.5
  TOP w0.114: v1(36.26,54.95) 36.52,54.69 R42.2 ; C16.1 13.45,81.55 v1(13.84,81.15) ; v1(11.51,55.56) JL2.28 v1(9.66,55.56) ; U3.2 20.91,69.05 20.36,68.5 19.21,68.5 v1(19.18,68.48) ; v1(11.4,54.06) JL2.31 v1(9.66,54.06) ; v1(42.78,40.89) 42.59,40.7 J6.15 ; v1(11.43,51.06) JL2.37 v1(9.66,51.06) ; v1(44.9,61.7) 43.52,60.33 J6.51 43.52,59.65 v1(44.8,58.38) ; v1(7.02,48.61) 7.76,47.87 JL2.41 8.72,47.41 v1(9.08,47.05) ; v1(10.7,76.2) U2.2 v1(10.7,78.44) 11.29,78.44 v1(11.52,78.67) ; J6.13 42.33,39.7 v1(42.78,39.24) ; v1(18.98,65.65) 19.38,65.65 19.45,65.58 C20.2 20.53,66.1 20.88,66.46 20.88,67.14 20.36,67.67 19.13,67.67 v1(19.08,67.61) ; v1(37.36,38.52) 37.66,38.82 R39.2 ; J2.8 7.93,41.96 v1(8.94,42.98) 14.06,42.98 16.16,40.87 16.16,39.67 17.1,38.73 32.08,38.73 33.39,40.04 D8.1 ; R30.1 v1(13.97,78.15) ; C6.1 v1(27.18,13.72) ; v1(47.02,61.57) 46.59,62 R20.1 ; U1.1 v1(24.87,14.27) ; v1(44.98,30.58) 45.22,30.34 45.22,29.56 45.6,29.18 45.6,24.05 ; v1(9.58,60.74) 9.58,60.61 10.13,60.06 JL2.19 ; v1(15.07,52.36) 15.06,52.37 RL24.1 ; D1.2 17.44,73.35 v1(17.38,73.41) ; R18.1 v1(42.72,62.87) ; C27.1 v1(37.45,34.45) ; R32.2 v1(17.01,68.48) ; v1(19.8,14.61) 20,14.41 C4.1 C5.1 ; Q3.2 v1(37.13,64.76) ; RL22.2 12.57,63.32 CL3.2 v1(11.65,63.31) ; R26.1 v1(36.8,62.87) ; v1(23.57,10.75) 24.17,11.34 C1.2 ; C19.1 13.06,74.95 v1(13.06,75.21) ; v1(36.11,55.7) 36.23,55.58 C22.1 ; v1(47,65.31) 46.53,64.84 Q2.2 45.56,64.86 v1(44.83,64.86) ; v1(47.02,19.66) 47.17,19.81 47.17,30.95 v1(46.98,31.14) ; v1(40.12,56.2) J6.46 42.09,56.2 v1(42.19,56.3) ; C10.2 v1(31.77,82.55) ; C12.1 v1(32.22,83.69) ; v1(37.51,42.48) 37.66,42.33 R38.2 ; C11.2 v1(32.47,81.41) ; v1(13.05,75.83) 12.67,75.83 C18.1 ; C2.2 v1(23.14,16.47) ; v1(11.53,62.03) 11.06,61.56 JL2.16 v1(9.6,61.56) ; J2.3 v1(9.49,37.96) ; C13.2 v1(39.56,69.35) ; C21.2 v1(15.99,72.67) ; C14.2 v1(16.12,74.17) ; v1(6.32,33.08) 6.44,32.97 J2.7 ; Q1.2 v1(42.28,63.9) ; v1(11.41,64.57) 11.41,64.56 10.9,64.06 JL2.11 v1(9.67,64.06) ; JL2.42 v1(6.37,71.21) ; J6.3 v1(43.13,34.7) ; CL4.2 v1(11.74,52.37) 11.55,52.56 JL2.34 v1(9.66,52.56) ; C8.1 v1(29.59,14.17) ; v1(11.48,57.06) JL2.25 9.81,57.06 v1(9.57,56.82) 9.52,56.87 8.5,56.87 v1(8.47,56.84) ; C9.2 v1(13.54,38.86) ; C7.1 v1(28.45,13.76) ; R29.1 v1(13.12,78.79) ; C17.1 v1(11.28,81.62) ; C3.2 v1(22.67,10.81)
  TOP w0.305: v1(34.43,38.58) C29.1 R49.1 36.64,39.12 R39.2 ; v1(34.41,41.18) 34.4,41.18 33.73,40.51 D8.1
  TOP w0.381: C27.1 R47.2 38.72,34.45 v1(38.67,34.4) ; v1(34.55,30.97) 34.55,31.2 34.02,31.72 C26.1 34.19,31.63 D6.2 35.9,31.63 ; v1(31.3,34.17) 32.03,34.17 D5.2 ; C30.1 30.72,35.71 v1(31.35,35.07)
  BOTTOM w0.114: v1(32.21,11.08) J1.50 v1(32.21,12.86) ; v1(5.59,56.98) JM1.25 v1(4.19,56.98) ; J1.67 v1(36.71,16.5) ; v1(13.84,81.15) v1(14.47,80.52) ; v1(36.71,12.86) J1.68 v1(36.71,11.12) ; v1(8.48,55.57) 7.97,56.08 JM1.22 v1(7.15,56.08) ; JM1.10 v1(7.15,52.48) ; v1(33.71,18.31) J1.55 v1(33.71,16.5) ; v1(5.59,55.18) JM1.19 v1(4.19,55.18) ; J1.14 23.21,11.11 v1(23.57,10.75) ; v1(39.66,12.95) 39.66,12.66 39.71,12.61 J1.80 ; v1(5.67,61.21) 5.64,61.18 JM1.39 ; R40.2 41.67,33.02 v1(41.49,32.85) ; v1(35.21,18.34) J1.61 v1(35.21,16.5) ; v1(10.7,78.44) v1(10.7,79.19) ; J1.33 28.21,17.75 28.92,18.47 v1(29.1,18.47) ; v1(3.9,51.98) 4.3,51.58 JM1.7 v1(5.59,51.58) ; v1(32.41,16.5) 32.21,16.7 J1.49 v1(32.21,18.29) 31.96,18.53 31.38,18.53 ; v1(30.61,16.49) 30.71,16.59 J1.43 30.71,17.86 v1(31.07,18.23) 31.38,18.53 ; v1(33.71,12.86) J1.56 v1(33.71,11.13) ; J1.79 v1(39.71,16.5) ; J1.1 v1(20.21,18.16) ; JM1.52 5.66,49.53 5.66,49.79 v1(5.66,49.8) ; v1(4.19,53.38) JM1.13 v1(5.59,53.38) ; v1(29.21,11.15) J1.38 v1(29.21,12.86) ; J1.12 v1(22.71,12.86) ; v1(9.69,58.41) 9.86,58.25 CM2.2 CM3.2 11.77,58.25 v1(11.87,58.35) ; v1(34.41,41.18) 34.41,43.71 34.9,44.19 34.9,51.98 33.35,53.53 33.35,64.31 32.7,64.96 32.7,68.94 32.01,69.64 32.01,76.53 33.06,77.58 33.06,80.82 v1(32.47,81.41) ; v1(35.21,12.86) J1.62 v1(35.21,11.12) ; JM1.53 v1(5.21,66.07) ; v1(38.21,12.86) J1.74 v1(38.21,11.18) ; v1(42.27,45.29) 41.87,44.89 41.87,41.01 R41.2 42.67,40.78 v1(42.78,40.89) ; JM1.28 v1(7.15,57.88) ; J1.18 v1(24.21,12.86) ; J1.82 v1(17.96,16.12) ; v1(30.71,11.1) J1.44 30.71,12.61 v1(30.96,12.87) ; 22.66,21.45 v1(23.71,20.4) 24.71,19.4 J1.19 v1(24.71,16.5) ; 13.54,38.03 v1(13.54,38.86) ; J1.73 v1(38.21,16.5) ; v1(30.21,16.1) 29.71,16.6 J1.39 v1(29.71,18.47) 29.93,18.69 31.21,18.69 31.38,18.53 ; J1.29 v1(27.21,18.4) ; J1.28 v1(26.71,12.87) ; v1(4.12,58.78) JM1.31 v1(5.68,58.78) ; JM1.16 v1(7.15,54.28) ; v1(40.12,56.2) 40.27,56.2 R43.2 C23.1 ; JM1.4 v1(7.15,50.68) ; J1.7 v1(21.71,16.5)
  BOTTOM w0.305: v1(34.41,41.18) v1(34.41,40.29) v1(34.41,39.32) 34.43,39.3 v1(34.43,38.58)
  vias: v1(0.73,90.72) v1(0.73,83.1) v1(0.73,79.29) v1(0.73,75.48) v1(0.73,71.67) v1(0.73,67.86) v1(0.73,64.05) v1(0.73,60.24) v1(0.73,56.43) v1(0.73,52.62) v1(0.73,48.81) v1(0.73,45) v1(0.73,41.19) v1(0.73,37.38) v1(0.76,86.11) v1(0.78,31.11) v1(2.37,48.54) v1(2.63,73.86) v1(2.63,57.84) v1(2.7,77.44) v1(2.73,54.91) v1(2.85,51.64) v1(3.16,69.85) v1(3.21,45.39) v1(3.74,61.16) v1(4.15,83.74) v1(4.23,42.51) v1(4.23,38.7) v1(4.23,34.89) v1(4.23,31.08) v1(4.25,81.36) v1(4.25,78.64) v1(4.63,72.44) v1(6.06,31.07) v1(6.31,43.51) v1(6.44,47.78) v1(6.46,41.45) v1(6.63,90.72) v1(6.82,75.13) v1(6.97,61.24) v1(7.12,65.7) v1(7.53,82.96) v1(7.58,72.49) v1(7.6,38.76) v1(7.68,35.18) v1(8.09,85.34) v1(8.24,89.26) v1(8.59,60.99) v1(8.7,41.15) v1(9.03,78.56) v1(9.05,62.87) v1(9.31,32.97) v1(9.61,49.78) v1(10.63,46.71) v1(10.78,43.66) v1(10.88,90.72) v1(11.11,48.86) v1(11.34,84.58) v1(11.49,34.32) v1(11.46,30.93) v1(11.82,37.72) v1(12.35,80.77) v1(12.38,79.6) v1(12.46,78.49) v1(12.68,65.94) v1(12.79,62.66) v1(13.12,46.76) v1(13.15,55.39) v1(13.17,54.18) v1(13.21,50.86) v1(13.22,43.6) v1(13.16,27.13) v1(13.16,23.32) v1(13.16,19.51) v1(13.16,15.7) v1(13.16,11.89) v1(13.16,8.08) v1(13.16,4.27) v1(13.3,0.72) v1(13.47,68.99) v1(13.6,72.34) v1(13.78,37.74) v1(13.95,39.85) v1(14.41,75.9) v1(14.49,63.12) v1(14.69,90.72) v1(14.72,28.42) v1(14.84,40.36) v1(14.77,23.09) v1(14.89,79.17) v1(14.92,77.43) v1(14.87,67.51) v1(15.05,60.02) v1(15.12,57.25) v1(15.12,55.37) v1(15.1,32.66) v1(15.17,58.65) v1(15.69,0.73) v1(15.76,84.18) v1(15.86,41.58) v1(15.88,19.58) v1(15.91,15.8) v1(15.99,61.42) v1(16.24,78.86) v1(16.21,69.82) v1(16.21,37.82) v1(16.3,50.8) v1(16.85,76.45) v1(16.85,65.43) v1(17,52.22) v1(16.98,10.16) v1(17.1,54.03) v1(17.18,60.43) v1(17.26,67.49) v1(17.33,58.55) v1(17.36,62.48) v1(17.36,35.46) v1(17.46,57.25) v1(17.51,55.39) v1(17.51,40.13) v1(17.69,21.67) v1(17.74,12.14) v1(17.79,29.9) v1(18.35,81.71) v1(18.5,90.72) v1(19.01,72) v1(18.95,65.06) v1(18.98,62.48) v1(18.96,58.95) v1(18.96,32.94) v1(18.98,7.8) v1(19.13,76.53) v1(19.11,72.66) v1(19.07,70.33) v1(19.06,51.03) v1(19.06,40.18) v1(19.22,74.18) v1(19.26,55.35) v1(19.29,53.41) v1(19.29,19.43) v1(19.44,60.4) v1(19.42,57.1) v1(19.39,34.77) v1(19.39,10.74) v1(20.66,31.17) v1(20.72,0.72) v1(20.84,22.45) v1(21.04,60.4) v1(20.99,51.28) v1(21.14,40.18) v1(21.14,27.12) v1(21.07,13.18) v1(21.24,57.15) v1(21.29,55.24) v1(21.34,53.37) v1(21.26,37.65) v1(21.35,33.73) v1(21.45,58.57) v1(21.8,81.19) v1(22.19,72.22) v1(22.31,90.72) v1(22.35,76.24) v1(22.36,67.93) v1(22.49,5.28) v1(22.58,29.17) v1(22.9,14.2) v1(23,81.84) v1(23.1,58.57) v1(23.17,55.14) v1(23.35,52.53) v1(23.3,40.23) v1(23.5,75.16) v1(23.45,36.55) v1(23.5,32.59) v1(23.56,56.52) v1(23.71,51.21) v1(23.76,73.56) v1(24.04,22.15) v1(24.31,7.1) v1(24.31,3.29) v1(24.43,0.72) v1(24.5,71.98) v1(24.94,21.23) v1(25.03,52.76) v1(25,51.08) v1(25.05,38.84) v1(25.05,35.71) v1(25.08,32) v1(25.07,18.79) v1(25.18,56.52) v1(25.36,54.23) v1(25.71,13.41) v1(25.74,10.14) v1(25.79,15.09) v1(25.94,75.06) v1(25.95,79.84) v1(26.05,62.44) v1(26.12,90.72) v1(26.19,19.99) v1(26.35,71.98) v1(26.28,58.68) v1(26.29,37.72) v1(26.36,60.41) v1(26.48,46.56) v1(26.91,10.92) v1(26.98,54.23) v1(27.19,78.89) v1(27.18,56.47) v1(27.9,49.81) v1(28.03,38.76) v1(28.08,85.83) v1(28.1,46.56) v1(28.08,34.95) v1(28.12,7.1) v1(28.12,3.29) v1(28.14,0.72) v1(28.15,52.81) v1(28.31,80.42) v1(28.31,78.87) v1(29.21,22.17) v1(29.18,9.83) v1(29.42,78.92) v1(29.45,41.93) v1(29.38,23.44) v1(29.47,80.49) v1(29.5,52.25) v1(29.52,49.81) v1(29.58,29.03) v1(29.73,31.04) v1(29.75,36.68) v1(29.83,24.65) v1(29.83,23.98) v1(29.81,22.17) v1(29.93,90.72) v1(29.94,83.96) v1(30.19,23.43) v1(30.34,34.77) v1(30.37,30.07) v1(30.38,22.18) v1(30.54,78.89) v1(30.54,53.19) v1(30.46,38.79) v1(30.57,80.44) v1(30.64,32) v1(30.96,10.05) v1(31.06,41.93) v1(31.2,14.7) v1(31.25,83.24) v1(31.45,47.35) v1(31.45,29.01) v1(31.63,80.47) v1(31.63,78.87) v1(31.84,85.9) v1(31.84,31.01) v1(31.85,0.72) v1(31.86,51.74) v1(31.93,7.1) v1(31.93,3.29) v1(32.5,39.24) v1(32.72,45.34) v1(32.75,78.87) v1(32.85,41.55) v1(33.08,47.37) v1(33.18,66.4) v1(33.33,85.34) v1(33.74,90.72) v1(33.84,20.09) v1(33.89,61.21) v1(33.99,69.75) v1(34.13,15.17) v1(34.35,45.31) v1(34.63,47.43) v1(34.56,29) v1(34.77,34.05) v1(34.75,19.2) v1(34.88,66.09) v1(35.17,79.34) v1(35.48,32.78) v1(35.55,0.72) v1(35.74,7.1) v1(35.74,3.29) v1(35.77,70.26) v1(36.47,18.25) v1(36.56,69.29) v1(36.95,14.25) v1(37.12,66.9) v1(37.24,47.61) v1(37.27,60.47) v1(37.28,59.53) v1(37.55,90.72) v1(38.01,38.48) v1(38.12,18.17) v1(38.37,25.44) v1(39.2,65.3) v1(39.15,27.96) v1(39.15,7.03) v1(39.25,41.4) v1(39.26,0.72) v1(39.43,70.71) v1(39.63,62.05) v1(39.79,29.29) v1(39.99,18.18) v1(40.07,44.58) v1(40.09,40.72) v1(40.12,39.9) v1(40.22,87.58) v1(40.19,43.48) v1(40.27,31.85) v1(40.4,84.12) v1(40.43,14.23) v1(41.01,67.94) v1(41.27,58.72) v1(41.36,90.72) v1(41.5,60.34) v1(41.72,65.23) v1(41.94,16.08) v1(42.17,57.73) v1(42.25,52.02) v1(42.22,49.05) v1(42.29,47.66) v1(42.43,22.08) v1(42.48,42.69) v1(42.71,67.82) v1(42.82,36.09) v1(42.91,29.54) v1(43.16,83.9) v1(43.2,54.72) v1(43.25,48.87) v1(43.2,45.17) v1(43.17,21.4) v1(43.25,56.62) v1(43.25,52.58) v1(43.29,37.57) v1(44.03,0.73) v1(44.1,66.5) v1(44.06,33.69) v1(44.32,7.48) v1(44.78,36.89) v1(44.9,57.11) v1(44.95,55.26) v1(44.86,50.77) v1(44.89,48.65) v1(44.9,44.36) v1(44.87,40.87) v1(44.92,28.91) v1(44.89,27.64) v1(44.86,23.1) v1(44.97,33.42) v1(45.06,38.55) v1(45.42,90.73) v1(46.68,0.72) v1(47,89.46) v1(47.02,84.43) v1(47.02,80.62) v1(47.02,76.81) v1(47.02,73) v1(47.02,69.19) v1(47.02,57.76) v1(47.02,53.95) v1(47.02,50.14) v1(47.02,46.33) v1(47.02,42.52) v1(47.02,38.71) v1(47.02,34.9) v1(47.03,22.45) v1(47.02,15.85) v1(47.02,12.04) v1(47.02,8.23) v1(47.02,4.42)
VCC-1V8: length 59.7
  TOP w0.305: JL2.38 11.08,50.56 11.58,50.06 ; 11.58,50.06 12.26,50.06 CL2.1 12.47,50.19 12.98,49.67 v1(13.77,49.67) ; 11.58,50.06 JL2.39
  TOP w0.381: v1(13.77,42.35) 15.52,40.61 15.52,34.64 23.45,26.7 23.45,21.49 25.54,19.4 27.32,19.4 28.62,18.1 R2.2 29.51,17.76 R3.2
  BOTTOM w0.305: v1(13.77,42.35) v1(13.77,49.67) 13.77,60.78 13.34,61.21 CM1.1 RM21.2
VCC-3V3-DEV: length 65.4
  TOP w0.203: C9.1 12.86,39.71 R6.2 ; v1(36.67,40.89) R33.1 R34.1 ; v1(32.35,22.06) 32.21,21.92 U4.4
  TOP w0.305: R37.1 39.49,55.49 39.78,55.2 J6.44 ; R14.2 45.87,68.64 45.87,69.33 ; R21.2 v1(38.56,68.56) ; 45.87,69.33 v1(44.99,69.33) ; 45.87,69.33 45.87,76.67 ; 17.69,64.7 R27.1
  TOP w0.381: U1.3 22.14,15.22 C5.2 C4.2 21.03,15.44 v1(21.03,16.32) 21.03,18.89 22.92,20.78 22.92,26.13 14.13,34.92 R4.2 R5.2 R7.2 12.86,37.79 12.01,38.64 C9.1 11.9,38.96 J2.2
  BOTTOM w0.203: v1(21.03,16.32) 21.21,16.5 J1.5 ; R36.1 40.18,34.61 39.71,35.07 36.43,35.07
  BOTTOM w0.305: 7.83,59.1 JM1.32 ; v1(38.56,68.56) 44.22,68.56 v1(44.99,69.33)
  vias: v1(12.3,60.5) v1(12.94,60.5) v1(20.46,16.33) v1(33.03,25.35) v1(33.56,25.35) v1(34.41,56.73) v1(35.14,56.74) v1(37.22,28.96) v1(37.83,28.94)
VCC-5V: length 10.6
  TOP w0.305: v1(38.1,67.06) 37.8,67.36 R24.2 ; v1(46.44,67.21) 46.29,67.21 R17.2 46.38,67.69 v1(46.44,67.75)
  BOTTOM w0.305: v1(46.44,67.21) 38.26,67.21 v1(38.1,67.06)
  vias: v1(25.43,11) v1(25.99,10.99)
VCCIO-LCD1: length 7.4
  TOP w0.203: R2.1 26.86,17.76 26.41,18.2 22.89,18.2 C2.1 22.21,17.69 v1(22.21,18.22)
  BOTTOM w0.203: J1.9 v1(22.21,18.22)
CTP-INT: length 28.2
  TOP w0.114: R7.1 12,36.97 v1(11.31,36.97) J2.4
  BOTTOM w0.114: v1(11.31,36.97) 14.03,36.97 22.32,28.67 22.32,21.01 24.21,19.13 J1.17
CTP-RST: length 31.1
  TOP w0.114: v1(14.9,35.46) 14.9,39.67 14.08,40.49 12.46,40.49 12.01,40.03 R6.1 11.97,39.96 J2.1
  BOTTOM w0.114: J1.15 23.71,18.85 22.05,20.5 22.05,28.23 14.9,35.38 v1(14.9,35.46)
CTP-SCK: length 25.5
  TOP w0.114: J2.6 v1(11.35,34.97) 11.97,34.97 R4.1
  BOTTOM w0.114: J1.11 22.71,18.82 21.52,20.01 21.52,27.35 13.9,34.97 v1(11.35,34.97)
CTP-SDA: length 26.5
  TOP w0.114: J2.5 10.4,35.94 v1(11.35,35.94) R5.1
  BOTTOM w0.114: v1(11.35,35.94) 13.63,35.94 21.79,27.79 21.79,20.27 23.21,18.85 J1.13
DCIN-12V:
  vias: v1(20.58,10.92) v1(21.19,10.92)
DITHB: length 2.8
  TOP w0.114: J6.4 v1(42.5,35.2)
  BOTTOM w0.114: v1(42.5,35.2) 42.52,35.17 R36.2 42.52,34.61 R40.1
DSI0-CKN: length 52.3
  TOP w0.102: RM5.2 22.53,58.19 v1(22.53,58.57)
  BOTTOM w0.102: J1.65 36.21,17.99 36.11,18.08 36.11,18.93 34.18,20.85 27.48,20.85 24.93,23.41 24.93,30.38 22.42,32.89 22.42,58.46 v1(22.53,58.57) 22.53,59 RL5.2
DSI0-CKP: length 52.3
  TOP w0.102: v1(22,58.57) 22,58.12 RM6.2
  BOTTOM w0.102: J1.63 35.71,17.99 35.8,18.08 35.8,18.8 34.05,20.55 27.35,20.55 24.62,23.28 24.62,30.25 22.11,32.76 22.11,58.46 v1(22,58.57) 22,59.02 RL6.2
DSI0-CLKN: length 22.9
  TOP w0.102: v1(6.58,56.4) 6.62,56.45 7.53,56.45 7.82,56.16 8.46,56.16 8.84,55.78 9.35,55.78 9.72,56.15 9.91,56.15 9.99,56.06 JL2.27 11.06,56.06 11.16,56.16 14.49,56.16 14.77,56.44 14.97,56.44 15.08,56.34 15.08,55.98 15.34,55.71 15.8,55.71 16.09,56.01 16.09,56.49 16.2,56.6 16.4,56.6 16.5,56.5 16.5,56.1 16.78,55.82 17.23,55.82 17.51,56.1 17.51,56.34 17.62,56.44 17.82,56.44 17.92,56.34 17.92,56.1 18.2,55.82 18.66,55.82 18.94,56.1 18.94,56.34 19.04,56.44 19.24,56.44 19.34,56.34 19.34,56.1 19.62,55.82 21.84,55.82 22.58,56.55 22.58,56.97 RM5.1
  BOTTOM w0.102: JM1.23 5.43,56.38 5.59,56.53 5.78,56.53 6.1,56.21 6.52,56.21 6.58,56.28 v1(6.58,56.4)
DSI0-CLKP: length 23
  TOP w0.102: RM6.1 22.17,57.13 22.27,57.03 22.27,56.68 21.72,56.12 21.49,56.12 21.31,56.3 21.08,56.3 20.9,56.12 19.75,56.12 19.65,56.23 19.65,56.46 19.37,56.74 18.91,56.74 18.63,56.46 18.63,56.23 18.53,56.12 18.33,56.12 18.23,56.23 18.23,56.46 17.95,56.74 17.49,56.74 17.21,56.46 17.21,56.23 17.11,56.12 16.9,56.12 16.8,56.23 16.8,56.62 16.53,56.9 16.07,56.9 15.79,56.62 15.79,56.13 15.67,56.02 15.47,56.02 15.38,56.11 15.38,56.46 15.1,56.74 14.65,56.74 14.36,56.46 11.16,56.46 11.06,56.56 JL2.26 10,56.56 9.9,56.45 9.59,56.45 9.23,56.09 8.97,56.09 8.59,56.46 7.94,56.46 7.65,56.75 6.17,56.75 v1(6.13,56.69)
  BOTTOM w0.102: JM1.24 6.92,56.68 6.73,56.75 6.3,56.75 v1(6.13,56.69)
DSI0-D0N: length 48
  TOP w0.102: RM1.2 26.44,53.8 v1(26.44,54.23)
  BOTTOM w0.102: RL1.2 26.44,54.64 v1(26.44,54.23) 26.32,54.11 26.32,53.14 25.82,52.63 25.82,31.8 26.51,31.11 26.51,24.08 27.62,22.97 34.3,22.97 39.1,18.16 39.1,17.85 39.21,17.75 J1.77
DSI0-D0P: length 48
  TOP w0.102: v1(25.91,54.23) 25.91,53.78 RM2.2
  BOTTOM w0.102: J1.75 38.71,17.73 38.8,17.82 38.8,18.04 34.17,22.66 27.5,22.66 26.2,23.96 26.2,30.98 25.51,31.67 25.51,52.76 26.02,53.26 26.02,54.11 v1(25.91,54.23) 25.91,54.71 RL2.2
DSI0-D1N: length 49.9
  TOP w0.102: RM3.2 24.64,56.09 v1(24.64,56.52)
  BOTTOM w0.102: J1.71 37.71,17.99 37.61,18.08 37.61,18.54 34.5,21.65 27.82,21.65 25.72,23.75 25.72,30.78 24.52,31.98 24.52,56.4 v1(24.64,56.52) 24.64,56.92 RL3.2
DSI0-D1P: length 49.9
  TOP w0.102: v1(24.1,56.52) 24.1,56.11 RM4.2
  BOTTOM w0.102: J1.69 37.21,17.99 37.3,18.08 37.3,18.41 34.37,21.35 27.69,21.35 25.42,23.62 25.42,30.65 24.22,31.85 24.22,56.4 v1(24.1,56.52) 24.1,56.94 RL4.2
DSI0-D2N: length 55.1
  TOP w0.102: v1(20.51,60.4) 20.51,59.96 RM7.2
  BOTTOM w0.102: J1.59 34.71,17.99 34.61,18.08 34.61,18.72 33.26,20.06 27.13,20.06 24.14,23.06 24.14,30 20.39,33.75 20.39,57.34 20.49,57.44 20.89,57.44 21.17,57.72 21.17,58.18 20.89,58.46 20.49,58.46 20.39,58.56 20.39,60.29 v1(20.51,60.4) 20.51,60.84 RL7.2
DSI0-D2P: length 55.1
  TOP w0.102: RM8.2 19.97,60.01 v1(19.97,60.4)
  BOTTOM w0.102: J1.57 34.21,17.99 34.3,18.08 34.3,18.59 33.13,19.76 27.01,19.76 23.84,22.93 23.84,29.88 20.09,33.62 20.09,57.46 20.37,57.75 20.76,57.75 20.86,57.85 20.86,58.05 20.76,58.15 20.37,58.15 20.09,58.43 20.09,60.29 v1(19.97,60.4) 19.97,60.84 RL8.2
DSI0-D3N: length 56.7
  TOP w0.102: RM9.2 18.44,61.93 v1(18.44,62.48)
  BOTTOM w0.102: J1.53 33.21,17.99 33.11,18.08 33.11,18.8 32.65,19.26 26.07,19.26 23.33,22 23.33,29.67 18.33,34.67 18.33,62.37 v1(18.44,62.48) 18.44,63.04 RL9.2
DSI0-D3P: length 56.8
  TOP w0.102: v1(17.91,62.48) 17.91,62.06 RM10.2
  BOTTOM w0.102: RL10.2 17.91,62.96 v1(17.91,62.48) 18.02,62.37 18.02,34.54 23.03,29.54 23.03,21.88 25.95,18.95 32.52,18.95 32.8,18.67 32.8,18.08 32.71,17.99 J1.51
DSI0-DN0: length 27.3
  TOP w0.102: v1(6.12,55.47) 6.41,55.35 7.06,55.35 9.26,53.16 9.76,53.16 9.85,53.06 JL2.33 11.06,53.06 11.15,53.15 13,53.15 13.33,53.48 13.86,53.48 14.19,53.15 16.79,53.15 18.23,51.71 18.84,51.71 19.13,52.01 19.13,52.49 19.24,52.59 19.44,52.59 19.54,52.49 19.54,52.01 19.84,51.71 20.32,51.71 20.6,51.99 20.6,52.45 20.71,52.56 20.92,52.56 21.01,52.47 21.01,51.99 21.29,51.71 25.89,51.71 26.41,52.24 26.41,52.55 RM1.1
  BOTTOM w0.102: v1(6.12,55.47) 6.41,55.35 6.75,55.35 7.04,55.48 JM1.20
DSI0-DN1: length 25.3
  TOP w0.102: v1(8.76,55.09) 9.08,54.77 9.35,54.66 9.99,54.66 10.08,54.56 JL2.30 11.06,54.56 11.16,54.66 14.41,54.66 14.69,54.38 15.25,54.38 15.53,54.66 15.83,54.66 16.11,54.38 16.68,54.38 16.95,54.66 18.1,54.66 18.68,54.08 19.68,54.08 19.96,54.36 19.96,54.71 20.07,54.81 20.27,54.81 20.37,54.71 20.37,54.36 20.65,54.08 24.03,54.08 24.62,54.67 24.62,54.9 RM3.1 ; v1(6.15,57.32) 6.48,57.19 7.59,57.19 7.84,57.44 8.39,57.44 v1(8.76,57.28)
  BOTTOM w0.102: v1(8.76,55.09) 8.87,55.21 8.87,57.17 v1(8.76,57.28) ; v1(6.15,57.32) 6.43,57.21 6.77,57.21 6.84,57.28 JM1.26
DSI0-DN2: length 20.4
  TOP w0.102: RM7.1 20.47,58.77 20.47,58.36 19.77,57.66 16.7,57.66 16.42,57.94 16.42,58.13 16.32,58.23 16.12,58.23 16.01,58.12 16.01,57.94 15.73,57.66 14.74,57.66 14.46,57.94 14.46,58.13 14.34,58.25 14.17,58.25 14.05,58.14 14.05,57.56 13.77,57.28 13.32,57.28 13.04,57.56 13.04,58.17 12.93,58.28 12.73,58.28 12.63,58.18 12.63,57.94 12.35,57.66 11.16,57.66 11.06,57.56 JL2.24 9.97,57.56 9.87,57.66 9.44,57.66 9.03,58.07 9.03,58.25 8.91,58.37 7.95,58.37 7.81,58.23 7.48,58.23 7.35,58.37 6.79,58.37 v1(6.62,58.2)
  BOTTOM w0.102: v1(6.62,58.2) 6.54,58.12 5.93,58.12 5.79,57.97 5.6,57.97 5.52,58.05 5.52,58.14 5.48,58.18 JM1.29
DSI0-DN3: length 22.3
  TOP w0.102: RM9.1 18.39,60.8 18.39,60.26 17.28,59.16 11.16,59.16 11.06,59.06 JL2.21 9.85,59.06 9.76,59.16 5.47,59.16 5.12,58.8 5.12,58.36 5.22,58.25 5.22,57.94 5.12,57.83 5.12,57.53 5.22,57.42 5.22,57.11 5.12,57 5.12,56.7 5.22,56.59 5.22,56.28 5.12,56.17 5.12,55.87 5.22,55.76 5.22,55.46 5.12,55.35 5.12,55.12 5.45,54.78 6.09,54.78 v1(6.15,54.84)
  BOTTOM w0.102: v1(6.15,54.84) 6.25,54.75 6.25,54.43 6.16,54.34 5.83,54.34 5.78,54.4 5.78,54.74 5.71,54.81 5.51,54.81 5.29,54.58 JM1.17
DSI0-DP0: length 27.3
  TOP w0.102: v1(6.6,55.71) 6.65,55.66 7.19,55.66 7.35,55.5 7.56,55.5 7.77,55.28 7.77,55.08 9.39,53.46 9.76,53.46 9.85,53.56 JL2.32 11.04,53.56 11.15,53.46 12.88,53.46 13.2,53.78 13.99,53.78 14.32,53.46 16.92,53.46 18.36,52.02 18.71,52.02 18.83,52.14 18.83,52.62 19.11,52.9 19.57,52.9 19.86,52.61 19.86,52.13 19.96,52.02 20.2,52.02 20.31,52.13 20.31,52.58 20.59,52.87 21.04,52.87 21.31,52.6 21.31,52.12 21.42,52.02 22.3,52.02 22.43,52.15 22.83,52.15 22.96,52.02 23.37,52.02 23.5,52.15 23.9,52.15 24.03,52.02 24.43,52.02 24.56,52.15 24.97,52.15 25.1,52.02 25.77,52.02 26.11,52.36 26.11,52.63 25.98,52.76 RM2.1
  BOTTOM w0.102: v1(6.6,55.71) 6.6,55.75 6.5,55.85 5.96,55.85 5.83,55.98 5.7,55.98 5.6,55.88 5.6,55.73 5.5,55.63 5.34,55.63 5.19,55.78 JM1.21
DSI0-DP1: length 25.2
  TOP w0.102: RM4.1 24.19,55.07 24.32,54.95 24.32,54.8 23.9,54.38 23.58,54.38 23.43,54.53 23.15,54.53 23,54.38 22.69,54.38 22.54,54.53 22.26,54.53 22.11,54.38 20.78,54.38 20.68,54.48 20.68,54.83 20.4,55.11 19.94,55.11 19.66,54.83 19.66,54.48 19.56,54.38 18.81,54.38 18.23,54.96 16.83,54.96 16.55,54.69 16.24,54.69 15.96,54.96 15.4,54.96 15.13,54.69 14.81,54.69 14.54,54.96 11.16,54.96 11.06,55.06 JL2.29 10.06,55.06 9.96,54.96 9.44,54.96 v1(9.29,55.11) ; v1(9.29,57.3) 8.84,57.74 7.71,57.74 7.46,57.49 6.69,57.49 v1(6.63,57.56)
  BOTTOM w0.102: v1(9.29,57.3) 9.18,57.18 9.18,55.22 v1(9.29,55.11) ; v1(6.63,57.56) 6.63,57.71 6.58,57.76 6.28,57.76 6.21,57.68 6,57.68 5.77,57.45 5.5,57.45 5.38,57.58 JM1.27
DSI0-DP2: length 20.4
  TOP w0.102: v1(6.17,58.49) 6.35,58.67 9.04,58.67 9.33,58.38 9.33,58.2 9.57,57.96 9.88,57.96 9.97,58.06 JL2.23 11.06,58.06 11.16,57.96 12.22,57.96 12.33,58.06 12.33,58.3 12.61,58.59 13.05,58.59 13.34,58.3 13.34,57.69 13.44,57.59 13.65,57.59 13.75,57.69 13.75,58.26 14.04,58.56 14.46,58.56 14.76,58.26 14.76,58.06 14.87,57.96 15.6,57.96 15.71,58.06 15.71,58.25 15.99,58.53 16.44,58.53 16.72,58.26 16.72,58.06 16.82,57.96 17.81,57.96 17.94,58.09 18.22,58.09 18.35,57.96 18.7,57.96 18.83,58.09 19.13,58.09 19.26,57.96 19.64,57.96 20.16,58.48 20.16,58.81 20.02,58.96 RM8.1
  BOTTOM w0.102: v1(6.17,58.49) 6.33,58.56 6.84,58.56 7.03,58.48 JM1.30
DSI0-DP3: length 22.3
  TOP w0.102: RM10.1 17.88,60.97 18.08,60.77 18.08,60.39 17.89,60.2 17.64,60.2 17.46,60.02 17.46,59.77 17.15,59.46 16.93,59.46 16.77,59.61 16.37,59.61 16.21,59.46 11.16,59.46 11.06,59.56 JL2.20 9.85,59.56 9.76,59.46 5.34,59.46 4.81,58.93 4.81,54.99 5.33,54.48 6.19,54.48 v1(6.6,54.56)
  BOTTOM w0.102: JM1.18 7.54,54.88 7.22,54.81 v1(6.6,54.56)
DSI1-CKN: length 50.7
  TOP w0.102: v1(30.52,41.94) 30.52,41.41 RM15.2
  BOTTOM w0.102: RL15.2 30.52,42.37 v1(30.52,41.94) 30.41,41.82 30.41,40.37 32.26,38.52 32.26,33.12 33.96,31.42 33.96,28.45 35.95,26.46 35.95,24.66 39.93,20.68 40.9,20.68 44.92,16.66 44.92,11.53 42.5,9.1 37.19,9.1 35.8,10.49 35.8,11.28 35.71,11.38 J1.64
DSI1-CKP: length 50.8
  TOP w0.102: v1(29.99,41.94) 29.99,41.47 RM16.2
  BOTTOM w0.102: RL16.2 29.99,42.35 v1(29.99,41.94) 30.1,41.82 30.1,41.54 29.96,41.39 29.96,41.09 30.1,40.94 30.1,40.24 30.38,39.96 30.38,39.81 30.59,39.6 30.75,39.6 30.96,39.38 30.96,39.23 31.18,39.01 31.33,39.01 31.55,38.8 31.55,38.64 31.69,38.5 31.84,38.5 31.95,38.39 31.95,38.01 31.82,37.88 31.82,37.6 31.95,37.47 31.95,37.2 31.82,37.07 31.82,36.79 31.95,36.66 31.95,36.38 31.82,36.25 31.82,35.98 31.95,35.85 31.95,35.57 31.82,35.44 31.82,35.16 31.95,35.03 31.95,34.76 31.82,34.63 31.82,34.35 31.95,34.22 31.95,33 33.66,31.29 33.66,28.32 35.65,26.34 35.65,24.53 39.8,20.38 40.77,20.38 44.62,16.53 44.62,11.66 42.37,9.41 37.31,9.41 36.66,10.06 36.66,10.24 36.45,10.45 36.27,10.45 36.11,10.61 36.11,11.28 36.21,11.38 J1.66
DSI1-CLKN: length 47.8
  TOP w0.102: RM15.1 30.52,40.26 30.52,39.83 30.13,39.45 25.11,39.45 23.35,41.2 23.35,41.68 23.12,41.91 22.69,41.91 22.59,41.81 22.59,41.07 22.31,40.79 21.85,40.79 21.57,41.07 21.57,41.81 21.47,41.91 21.27,41.91 21.16,41.81 21.16,41.07 20.88,40.79 20.43,40.79 20.15,41.07 20.15,41.81 20.05,41.91 19.84,41.91 19.74,41.81 19.74,41.07 19.46,40.79 19.01,40.79 18.73,41.07 18.73,41.81 18.62,41.91 18.42,41.91 18.32,41.81 18.32,41.07 18.04,40.79 17.43,40.79 14.11,44.12 5.56,44.12 5.05,44.63 4.88,44.8 3.01,46.67 3.01,50.55 4.71,52.25 6.32,52.25 6.61,52.13 v1(6.61,52.13)
  BOTTOM w0.102: v1(6.61,52.13) 7.22,51.88 JM1.8
DSI1-CLKP: length 47.7
  TOP w0.102: v1(6.14,51.89) 6.1,51.94 5.45,51.94 5.34,51.84 5.14,51.84 5.04,51.94 4.84,51.94 4.67,51.78 4.67,51.6 4.46,51.39 4.28,51.39 4.07,51.17 4.07,50.99 3.85,50.78 3.67,50.78 3.31,50.42 3.31,50.19 3.44,50.07 3.44,49.76 3.31,49.64 3.31,49.33 3.44,49.21 3.44,48.91 3.31,48.78 3.31,48.48 3.44,48.35 3.44,48.05 3.31,47.92 3.31,47.62 3.44,47.49 3.44,47.19 3.31,47.06 3.31,46.8 3.53,46.58 3.72,46.58 3.94,46.36 3.94,46.17 4.15,45.96 4.34,45.96 4.56,45.74 4.56,45.55 4.77,45.34 4.97,45.34 5.18,45.12 5.18,44.93 5.69,44.42 14.24,44.42 17.56,41.1 17.91,41.1 18.01,41.2 18.01,41.93 18.29,42.21 18.75,42.21 19.03,41.93 19.03,41.2 19.13,41.1 19.34,41.1 19.44,41.2 19.44,41.93 19.72,42.21 20.17,42.21 20.45,41.93 20.45,41.2 20.55,41.1 20.76,41.1 20.86,41.2 20.86,41.93 21.14,42.21 21.6,42.21 21.88,41.93 21.88,41.2 21.98,41.1 22.18,41.1 22.28,41.2 22.28,41.93 22.56,42.21 23.25,42.21 23.66,41.81 23.66,41.33 25.23,39.75 25.56,39.75 25.66,39.85 25.96,39.85 26.07,39.75 26.37,39.75 26.47,39.85 26.78,39.85 26.88,39.75 27.18,39.75 27.29,39.85 27.59,39.85 27.69,39.75 28,39.75 28.1,39.85 28.4,39.85 28.5,39.75 28.81,39.75 28.91,39.85 29.22,39.85 29.32,39.75 30.01,39.75 30.21,39.95 30.21,40.27 30.07,40.41 RM16.1
  BOTTOM w0.102: v1(6.14,51.89) 6.14,52.07 6.02,52.18 JM1.9
DSI1-D0N: length 59.7
  TOP w0.102: RM11.2 33.8,44.9 v1(33.8,45.31)
  BOTTOM w0.102: RL19.2 33.8,45.72 v1(33.8,45.31) 33.69,45.2 33.69,41.33 34.05,40.97 34.05,33.68 36.2,31.53 36.2,28.47 37.68,26.99 37.68,25.17 40.59,22.27 41.56,22.27 46.51,17.31 46.51,10.83 43.17,7.49 35.77,7.49 32.8,10.47 32.8,11.29 32.71,11.38 J1.52
DSI1-D0P: length 59.7
  TOP w0.102: v1(33.27,45.31) 33.27,44.87 RM12.2
  BOTTOM w0.102: J1.54 33.21,11.38 33.1,11.28 33.1,10.6 33.26,10.43 33.52,10.43 33.73,10.22 33.73,9.97 33.95,9.75 34.2,9.75 34.42,9.53 34.42,9.28 34.63,9.06 34.89,9.06 35.1,8.85 35.1,8.6 35.9,7.8 43.05,7.8 46.21,10.96 46.21,17.19 41.43,21.96 40.46,21.96 37.37,25.05 37.37,26.86 35.89,28.34 35.89,28.65 35.79,28.75 35.79,29.05 35.89,29.16 35.89,29.46 35.79,29.56 35.79,29.87 35.89,29.97 35.89,30.27 35.79,30.37 35.79,30.68 35.89,30.78 35.89,31.4 33.74,33.56 33.74,40.84 33.39,41.2 33.39,43.3 33.21,43.48 33.21,43.78 33.39,43.96 33.39,44.27 33.21,44.44 33.21,44.75 33.39,44.93 33.39,45.2 v1(33.27,45.31) 33.27,45.72 RL20.2
